# Altium PCB PI5_extension_board_001.PcbDoc
Units mm, origin at the board's own origin, x right, y up, seen from the top; angles counter-clockwise.
Board outline 54 x 20 mm, 2 copper layers (Top Layer, Bottom Layer); 2 components, 3 nets, 43 pads, 0 vias.
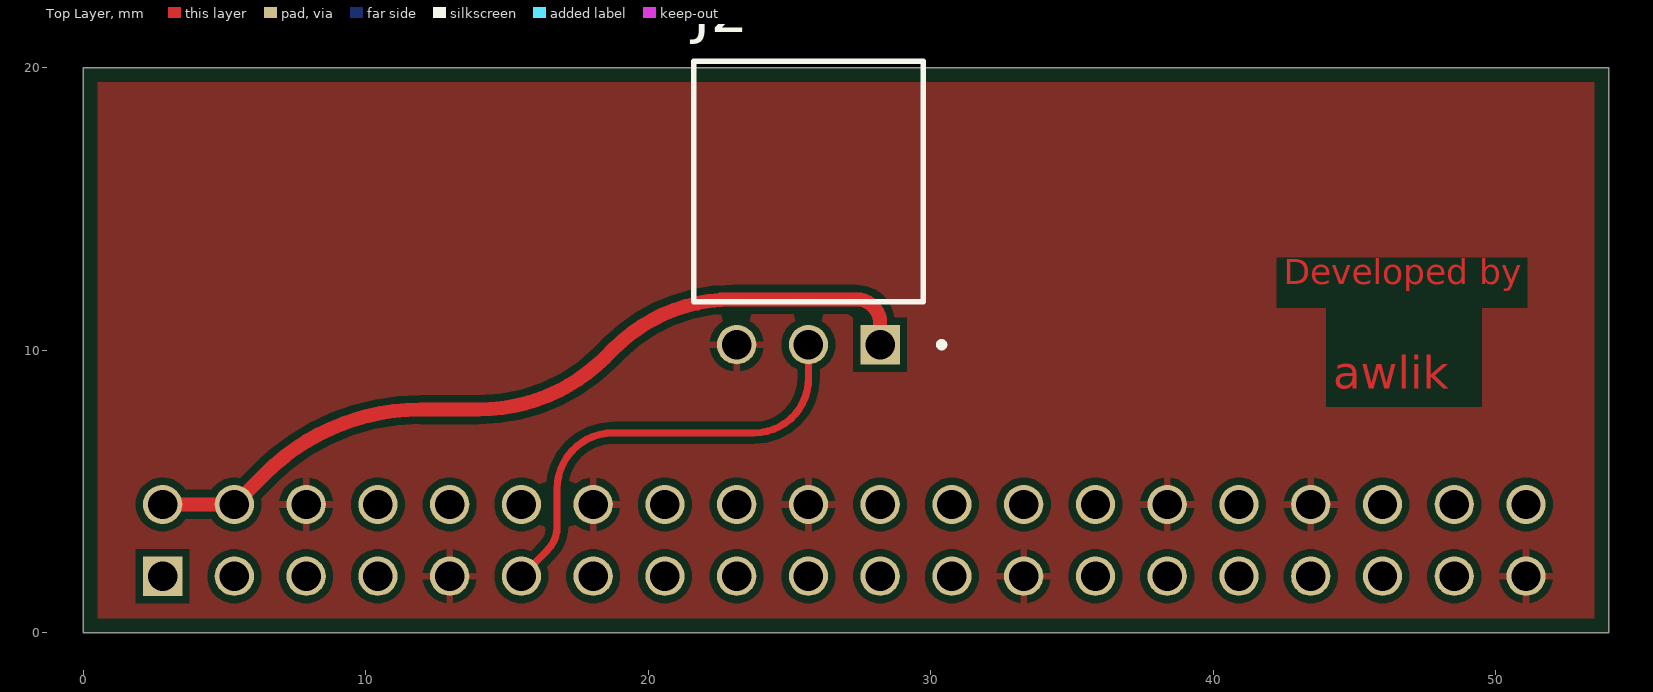
[diagram p0: Top Layer view]
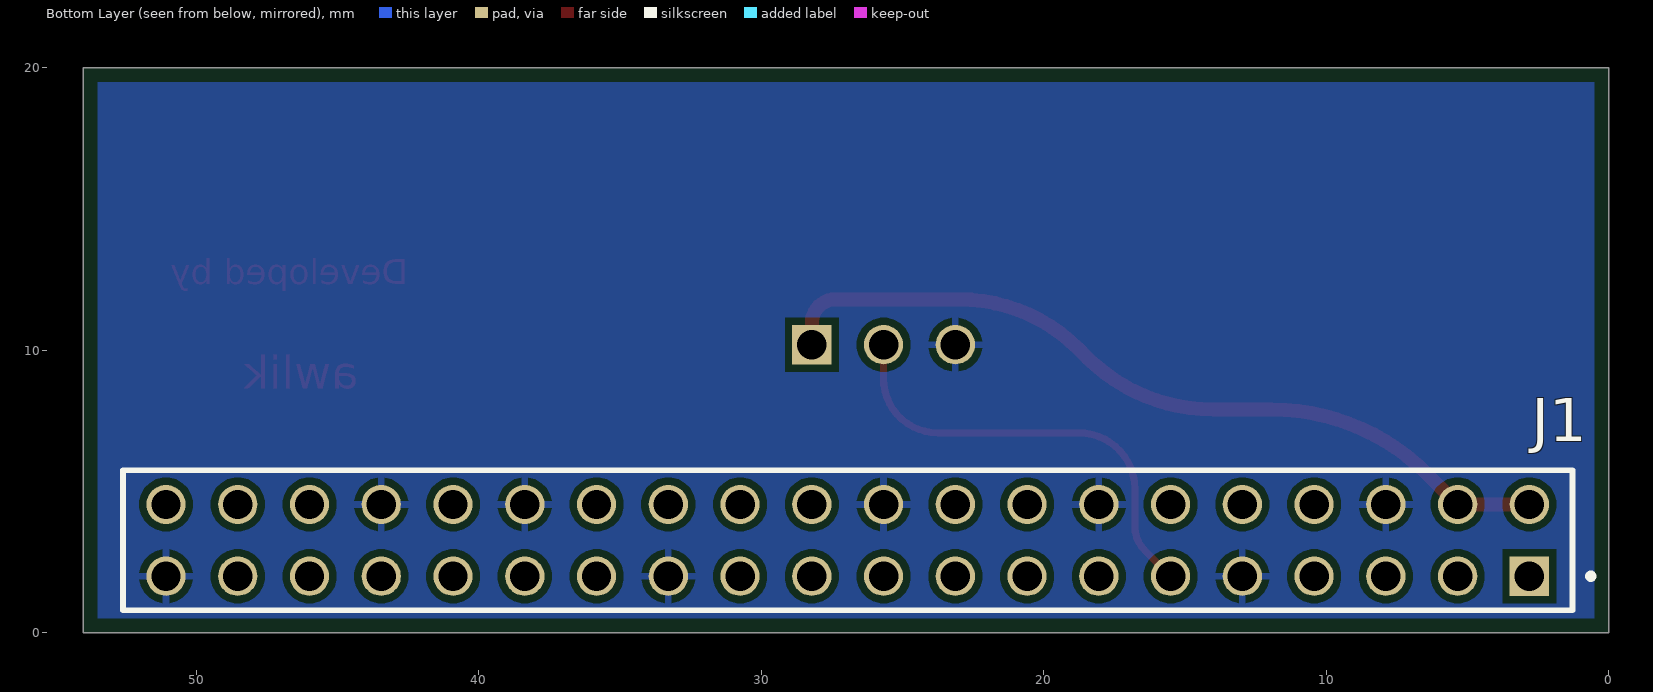
[diagram p1: Bottom Layer view, seen from below]

## Layer stack, top to bottom
Top Solder: solder mask 0.0102, Solder Resist, Dk 3.5
Top Layer: signal copper 0.0356
Dielectric 1: dielectric 0.32, FR-4, Dk 4.8
Bottom Layer: signal copper 0.0356
Bottom Solder: solder mask 0.0102, Solder Resist, Dk 3.5

## Board outline
0,0 0,20 54,20 54,0

## Design rules (kind name [scope] priority, off if disabled: settings)
BoardOutlineClearance [All] p1: gap=0.5 ignorepadtopadclearanceinfootprint=FALSE
Clearance [All] p1: gap=0.254 ignorepadtopadclearanceinfootprint=FALSE
PolygonConnect [All] p1: connectstyle=Relief reliefconductorwidth=0.254 reliefentries=4 polygonreliefangle="90 Angle" airgapwidth=0.254
RoutingVias [All] p1: holewidth=0.711 width=1.27 viastyle="Through Hole" minholewidth=0.711 minwidth=1.27 maxholewidth=0.711 maxwidth=1.27
SolderMaskExpansion [All] p1: expansion=0.102 istentingtop=FALSE
SupplyNets "Schematic Supply Nets_1" [InNet('GND')] p1: voltage=0.000
SupplyNets "Schematic Supply Nets" [InNet('+5V')] p2: voltage=0.000
Width [All] p1: maxlimit=0.254 minlimit=0.254 preferedwidth=0.254
30 further rules are at their usual default settings.

## Components (designator, comment, footprint, x,y, rotation, side; value= is the part's Value field where it differs from the comment)
J1 "SSW-120-01-G-D" SAMTEC_SSW-120-01-G-D 2.81,2 r180 bottom
J2 "SSW-103-02-G-S-RA" SAMTEC_SSW-103-02-G-S-RA 28.21,10.195 r0 top

## Footprints (in the part's own frame and the unit in brackets; to place one, negate y for a bottom-side part, rotate by r counter-clockwise, add the part's x,y. Pads: shape width x height; smd on the part's side, far side on the other; paste and mask are expansions set on the pad)
SAMTEC_SSW-103-02-G-S-RA [mm]
  rect 1.39x1.39 hole 1.04: 01(0,0)
  round 1.39 hole 1.04: 02(-2.54,0) 03(-5.08,0)
  silkscreen extent -6.61,-0.1 2.27,10.03, body extent -6.6,-0.33 1.52,9.91, height 2.73
SAMTEC_SSW-120-01-G-D [mm]
  rect 1.39x1.39 hole 1.04: 01(0,0)
  round 1.39 hole 1.04: 02(0,2.54) 03(-2.54,0) 04(-2.54,2.54) 05(-5.08,0) 06(-5.08,2.54) 07(-7.62,0) 08(-7.62,2.54) 09(-10.16,0) 10(-10.16,2.54) 11(-12.7,0) 12(-12.7,2.54) 13(-15.24,0) 14(-15.24,2.54) 15(-17.78,0) 16(-17.78,2.54) 17(-20.32,0) 18(-20.32,2.54) 19(-22.86,0) 20(-22.86,2.54) 21(-25.4,0) 22(-25.4,2.54) 23(-27.94,0) 24(-27.94,2.54) 25(-30.48,0) 26(-30.48,2.54) 27(-33.02,0) 28(-33.02,2.54) 29(-35.56,0) 30(-35.56,2.54) 31(-38.1,0) 32(-38.1,2.54) 33(-40.64,0) 34(-40.64,2.54) 35(-43.18,0) 36(-43.18,2.54) 37(-45.72,0) 38(-45.72,2.54) 39(-48.26,0) 40(-48.26,2.54)
  silkscreen extent -49.79,-1.21 2.27,3.75, body extent -49.78,-1.21 1.52,3.75, height 9.02

## Part data
J1 J2: Package=None, Availability=Unavailable, Price=None
  J1: MF=Samtec, MP=SSW-120-01-G-D
  J2: MF="Samtec Inc.", MP=SSW-103-02-G-S-RA

## Nets (pads, with @x,y where several pads share a name; then routed paths per layer and width w, separated by ;. In a path a pad name is that pad's centre, name@x,y a point inside that pad or via, vN(x,y) a via of type N, cw(c..) or ccw(c..) an arc to the next point about the centre after c; other vN are vias at no path point)
+5V: J1.02 J1.04 J2.01 | length 28.8
  Top Layer w0.5: J1.02 J1.04 6.428,5.618 cw(c11.935,0.115) 11.935,7.9 13.999,7.9 ; 14,7.9 ccw(c14,14.237) 18.481,9.756 18.776,10.051 cw(c22.996,5.834) 22.998,11.8 27.375,11.8 cw(c27.375,10.965) 28.21,10.965 J2.01
GND: J1.06 J1.09 J1.14 J1.20 J1.25 J1.30 J1.34 J1.39 J2.03
SENS_OUT: J1.11 J2.02 | length 15.9
  Top Layer w0.254: J1.11 16.432,2.922 ccw(c15.606,3.749) 16.775,3.749 ; 16.775,3.75 16.775,5.091 cw(c18.759,5.091) 18.759,7.075 23.75,7.075 ccw(c23.75,9) 25.675,9 25.675,10.195 J2.02
pads on no net: J1.01 J1.03 J1.05 J1.07 J1.08 J1.10 J1.12 J1.13 J1.15 J1.16 J1.17 J1.18 J1.19 J1.21 J1.22 J1.23 J1.24 J1.26 J1.27 J1.28 J1.29 J1.31 J1.32 J1.33 J1.35 J1.36 J1.37 J1.38 J1.40

## Polygon pours and split planes (outlines as drawn)
GND on Bottom Layer "GND_L02_P001" (solid, pour order 1): 0,20 54,20 54,0 0,0
GND on Top Layer "GND_L01_P000" (solid, pour order 0): 0,20 54,20 54,0 0,0

## Other copper
Top Layer:
  text "Developed by" at 42.5,12.038 h1.52
  text "awlik" at 44.25,8.25 h2

## Silkscreen, mask and mechanical layers (free items; w line width, h text height)
Top Solder:
  text "Developed by" at 42.5,12.038 h1.52
  text "Avlik" at 44.25,8.25 h2
Mechanical 13:
  the board outline again, w0.1